# Altium PCB HONGGAN_拼版.PcbDoc (part 1 of 5)
Units mm, origin at the board's own origin, x right, y up, seen from the top; angles counter-clockwise.
Board outline 106.01 x 72.01 mm, 4 copper layers (Top Layer, Mid-Layer 1, Mid-Layer 2, Bottom Layer); 400 components, 0 nets, 1244 pads, 3211 vias.
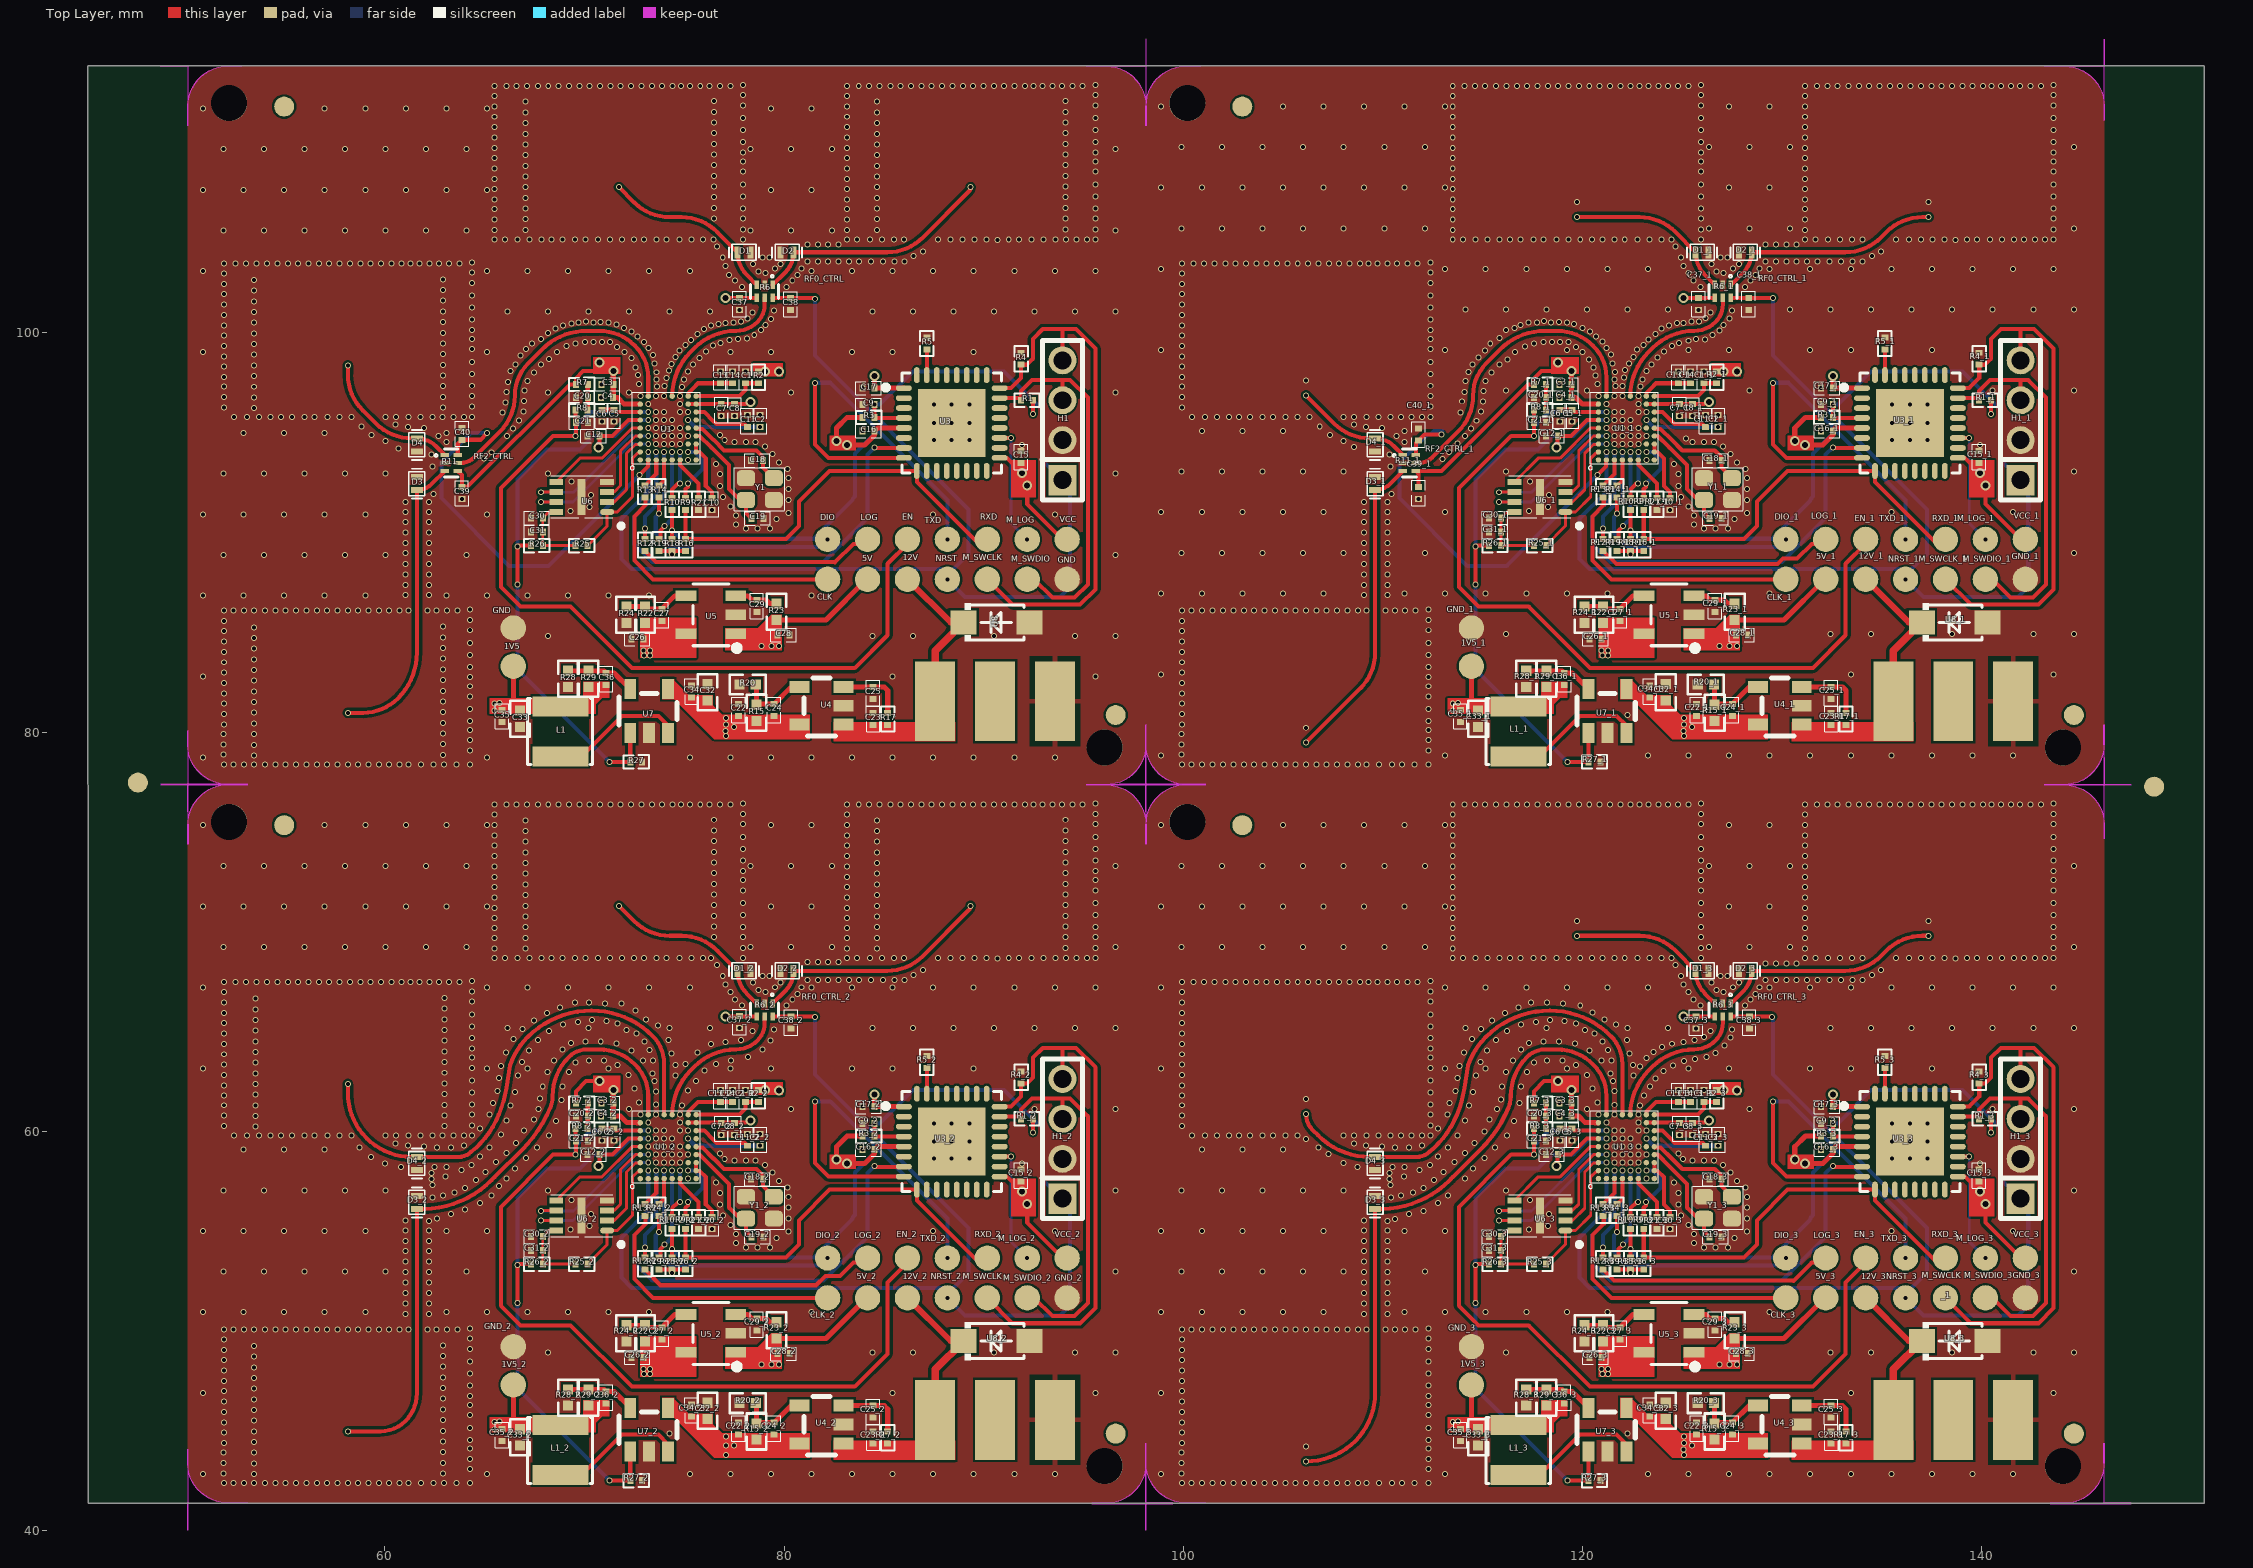
[diagram p0: Top Layer view]
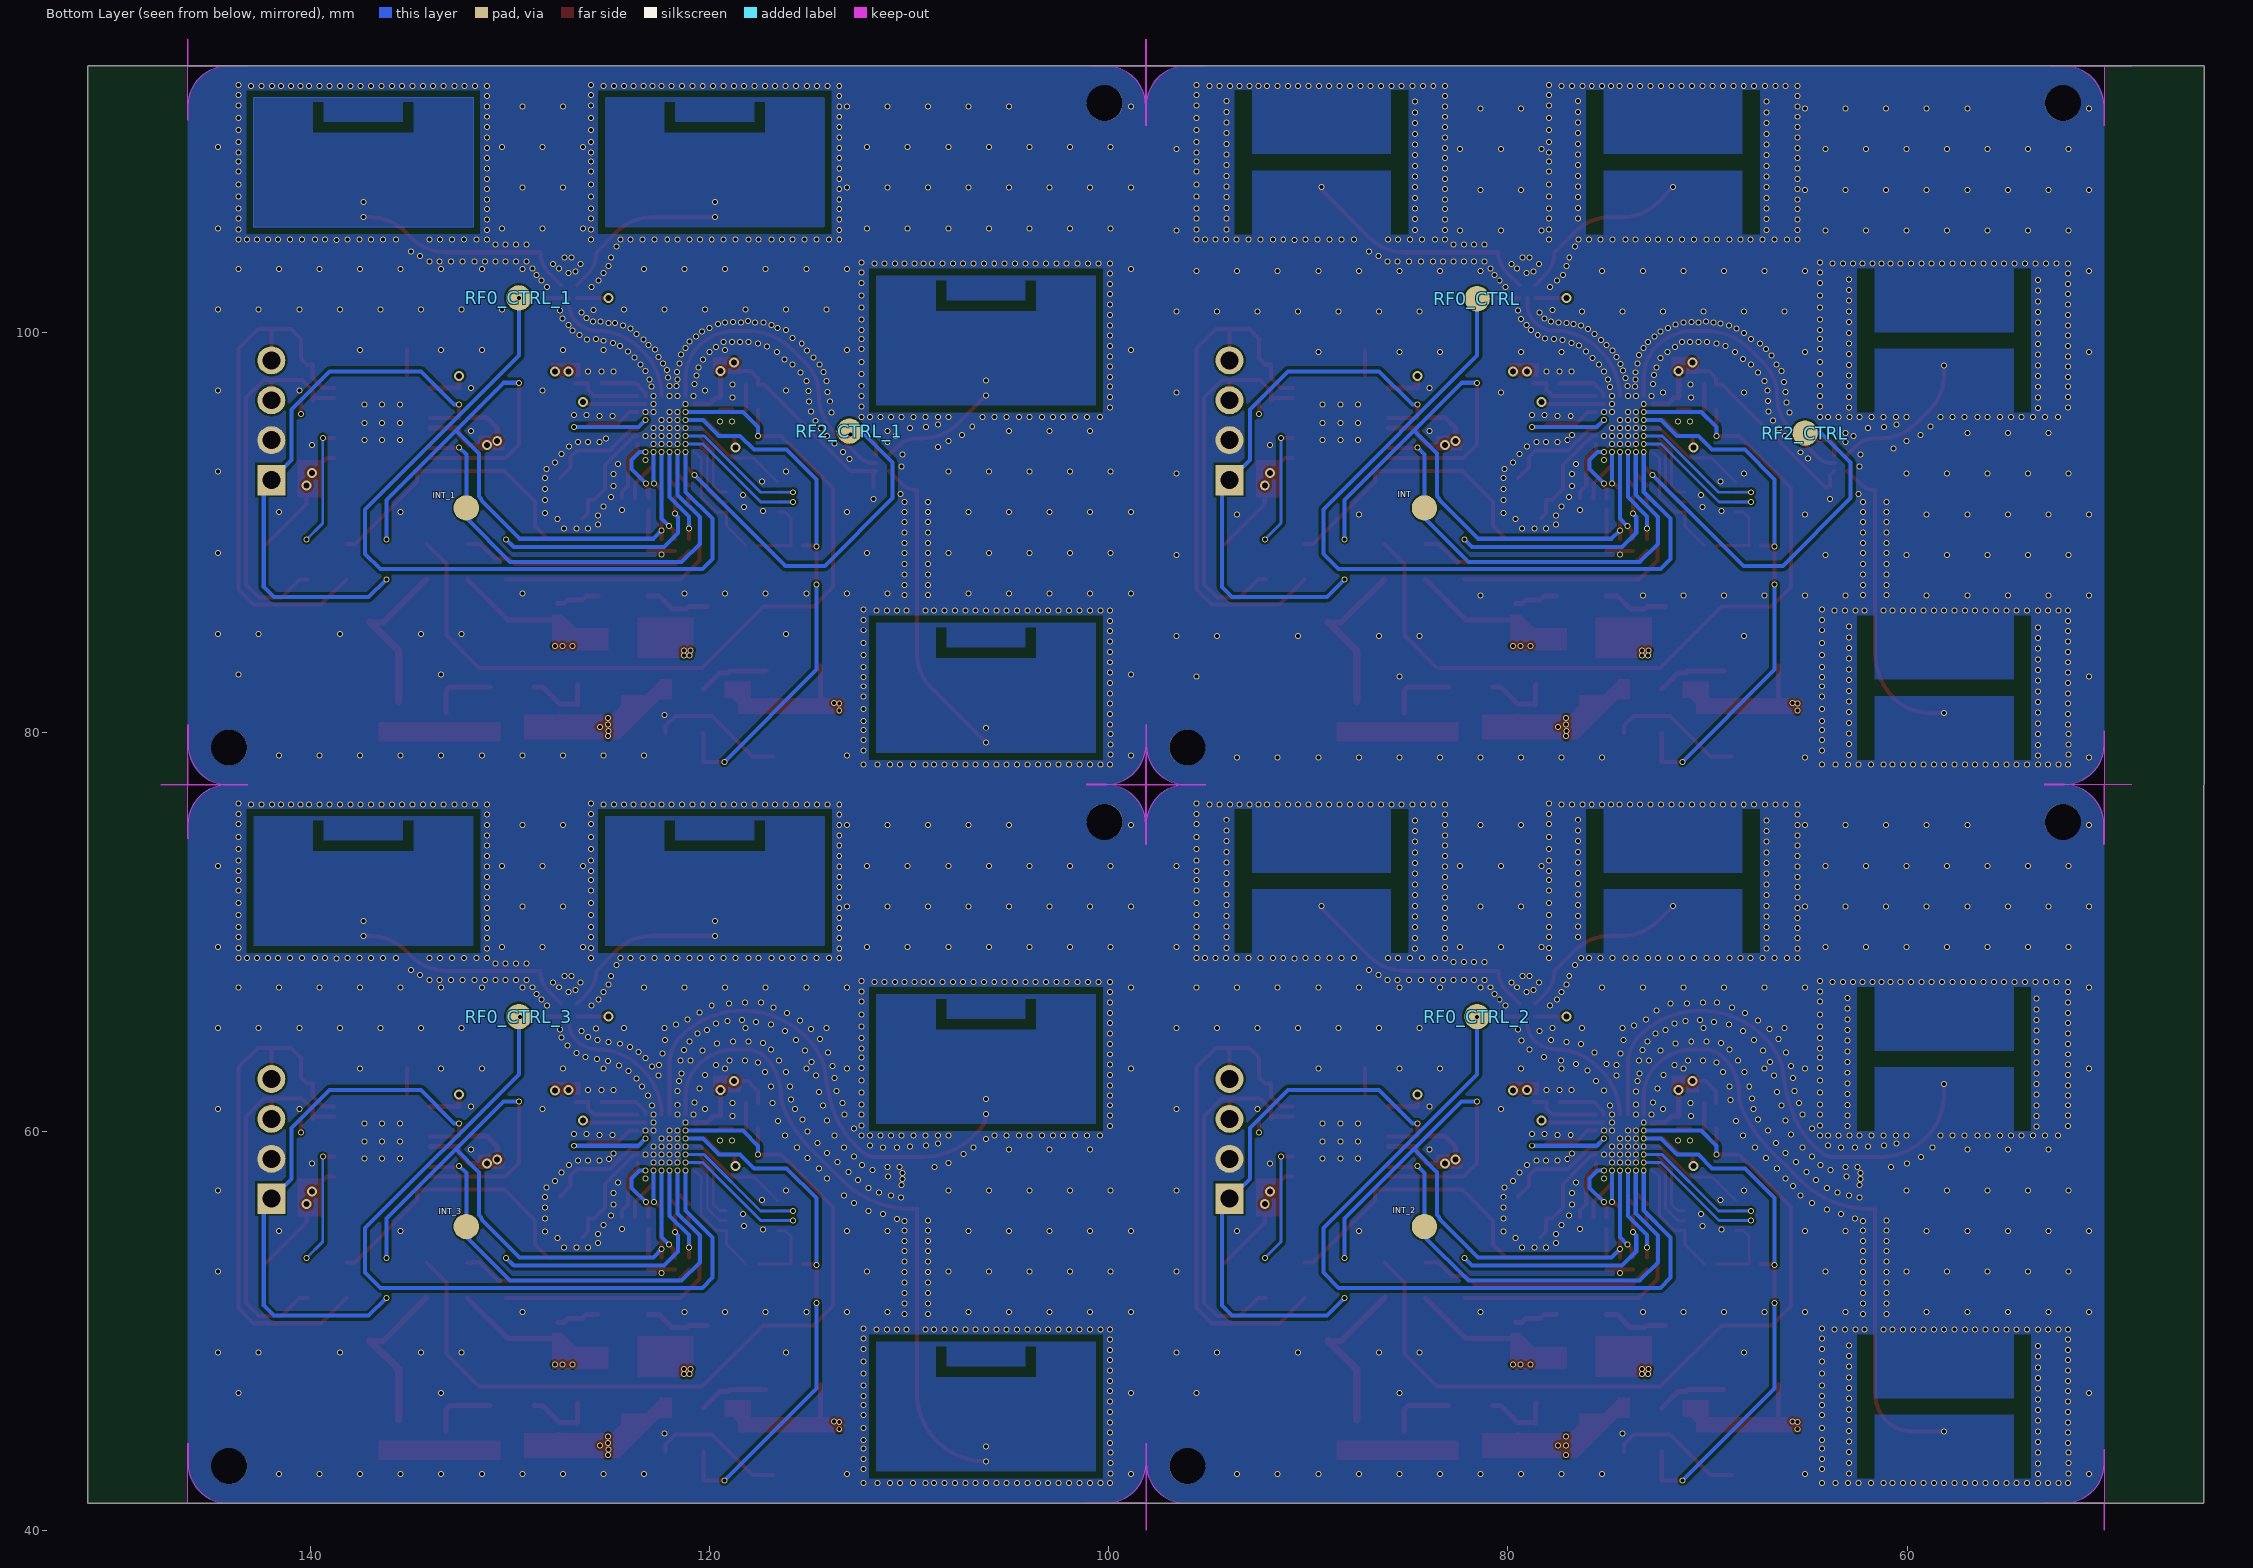
[diagram p1: Bottom Layer view, seen from below]
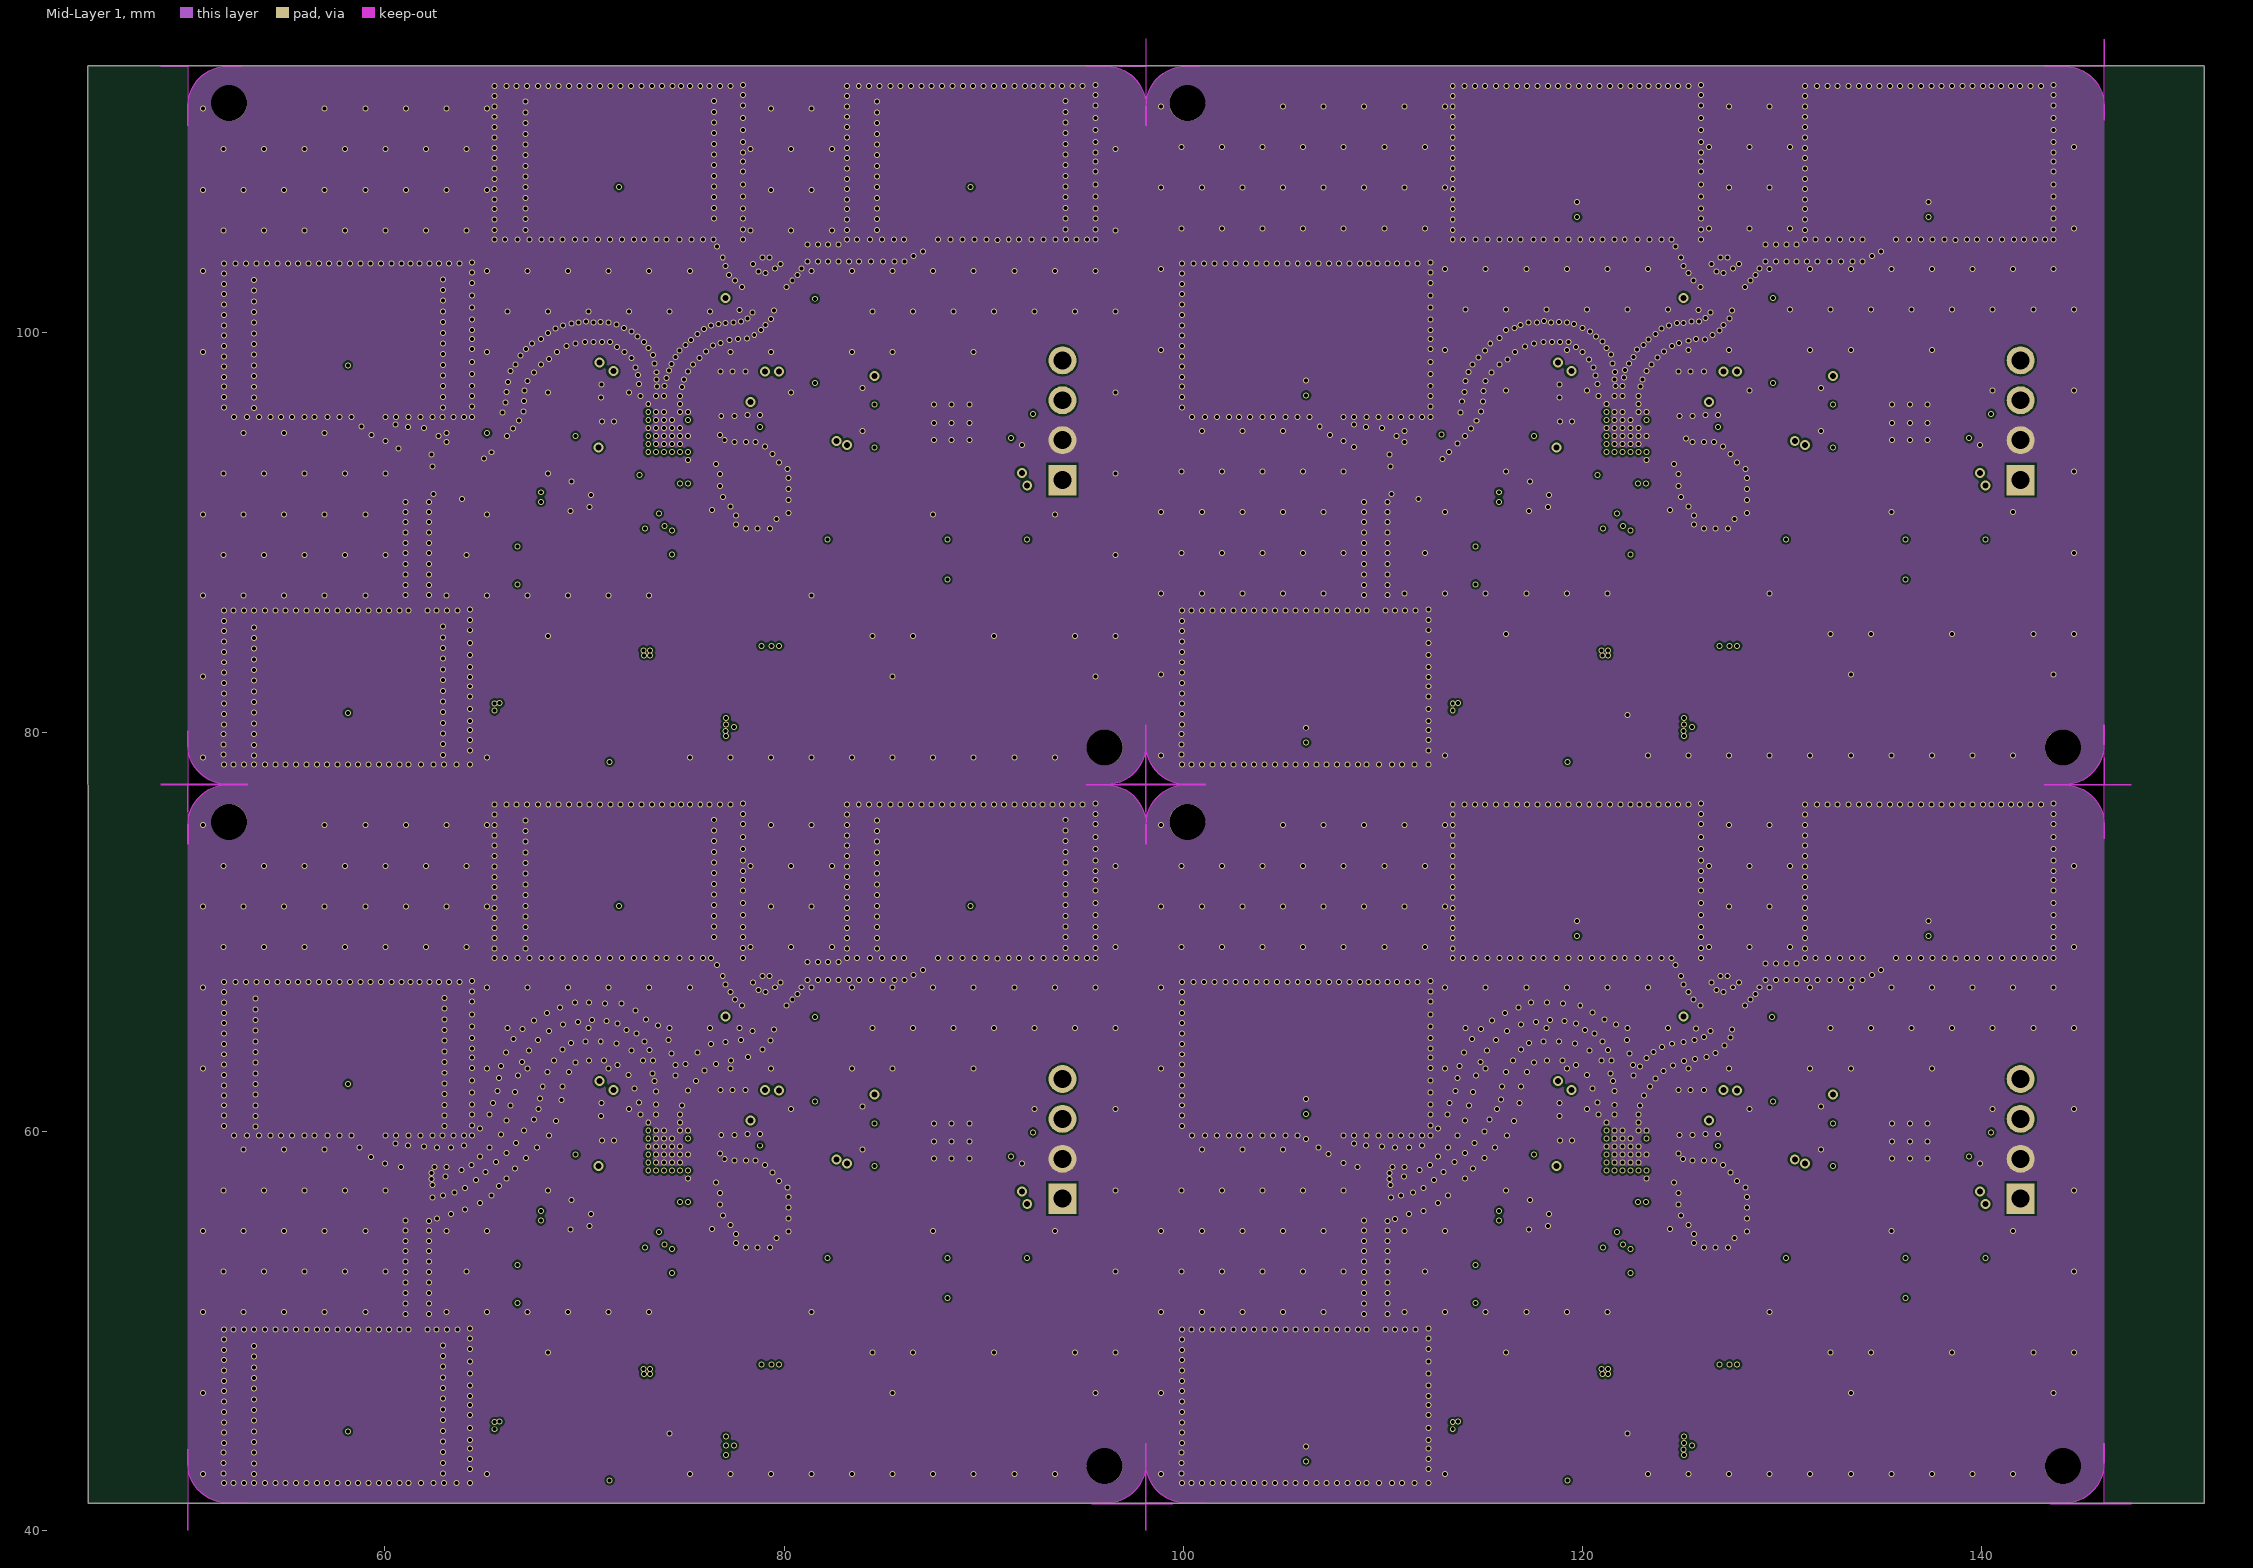
[diagram p2: Mid-Layer 1]
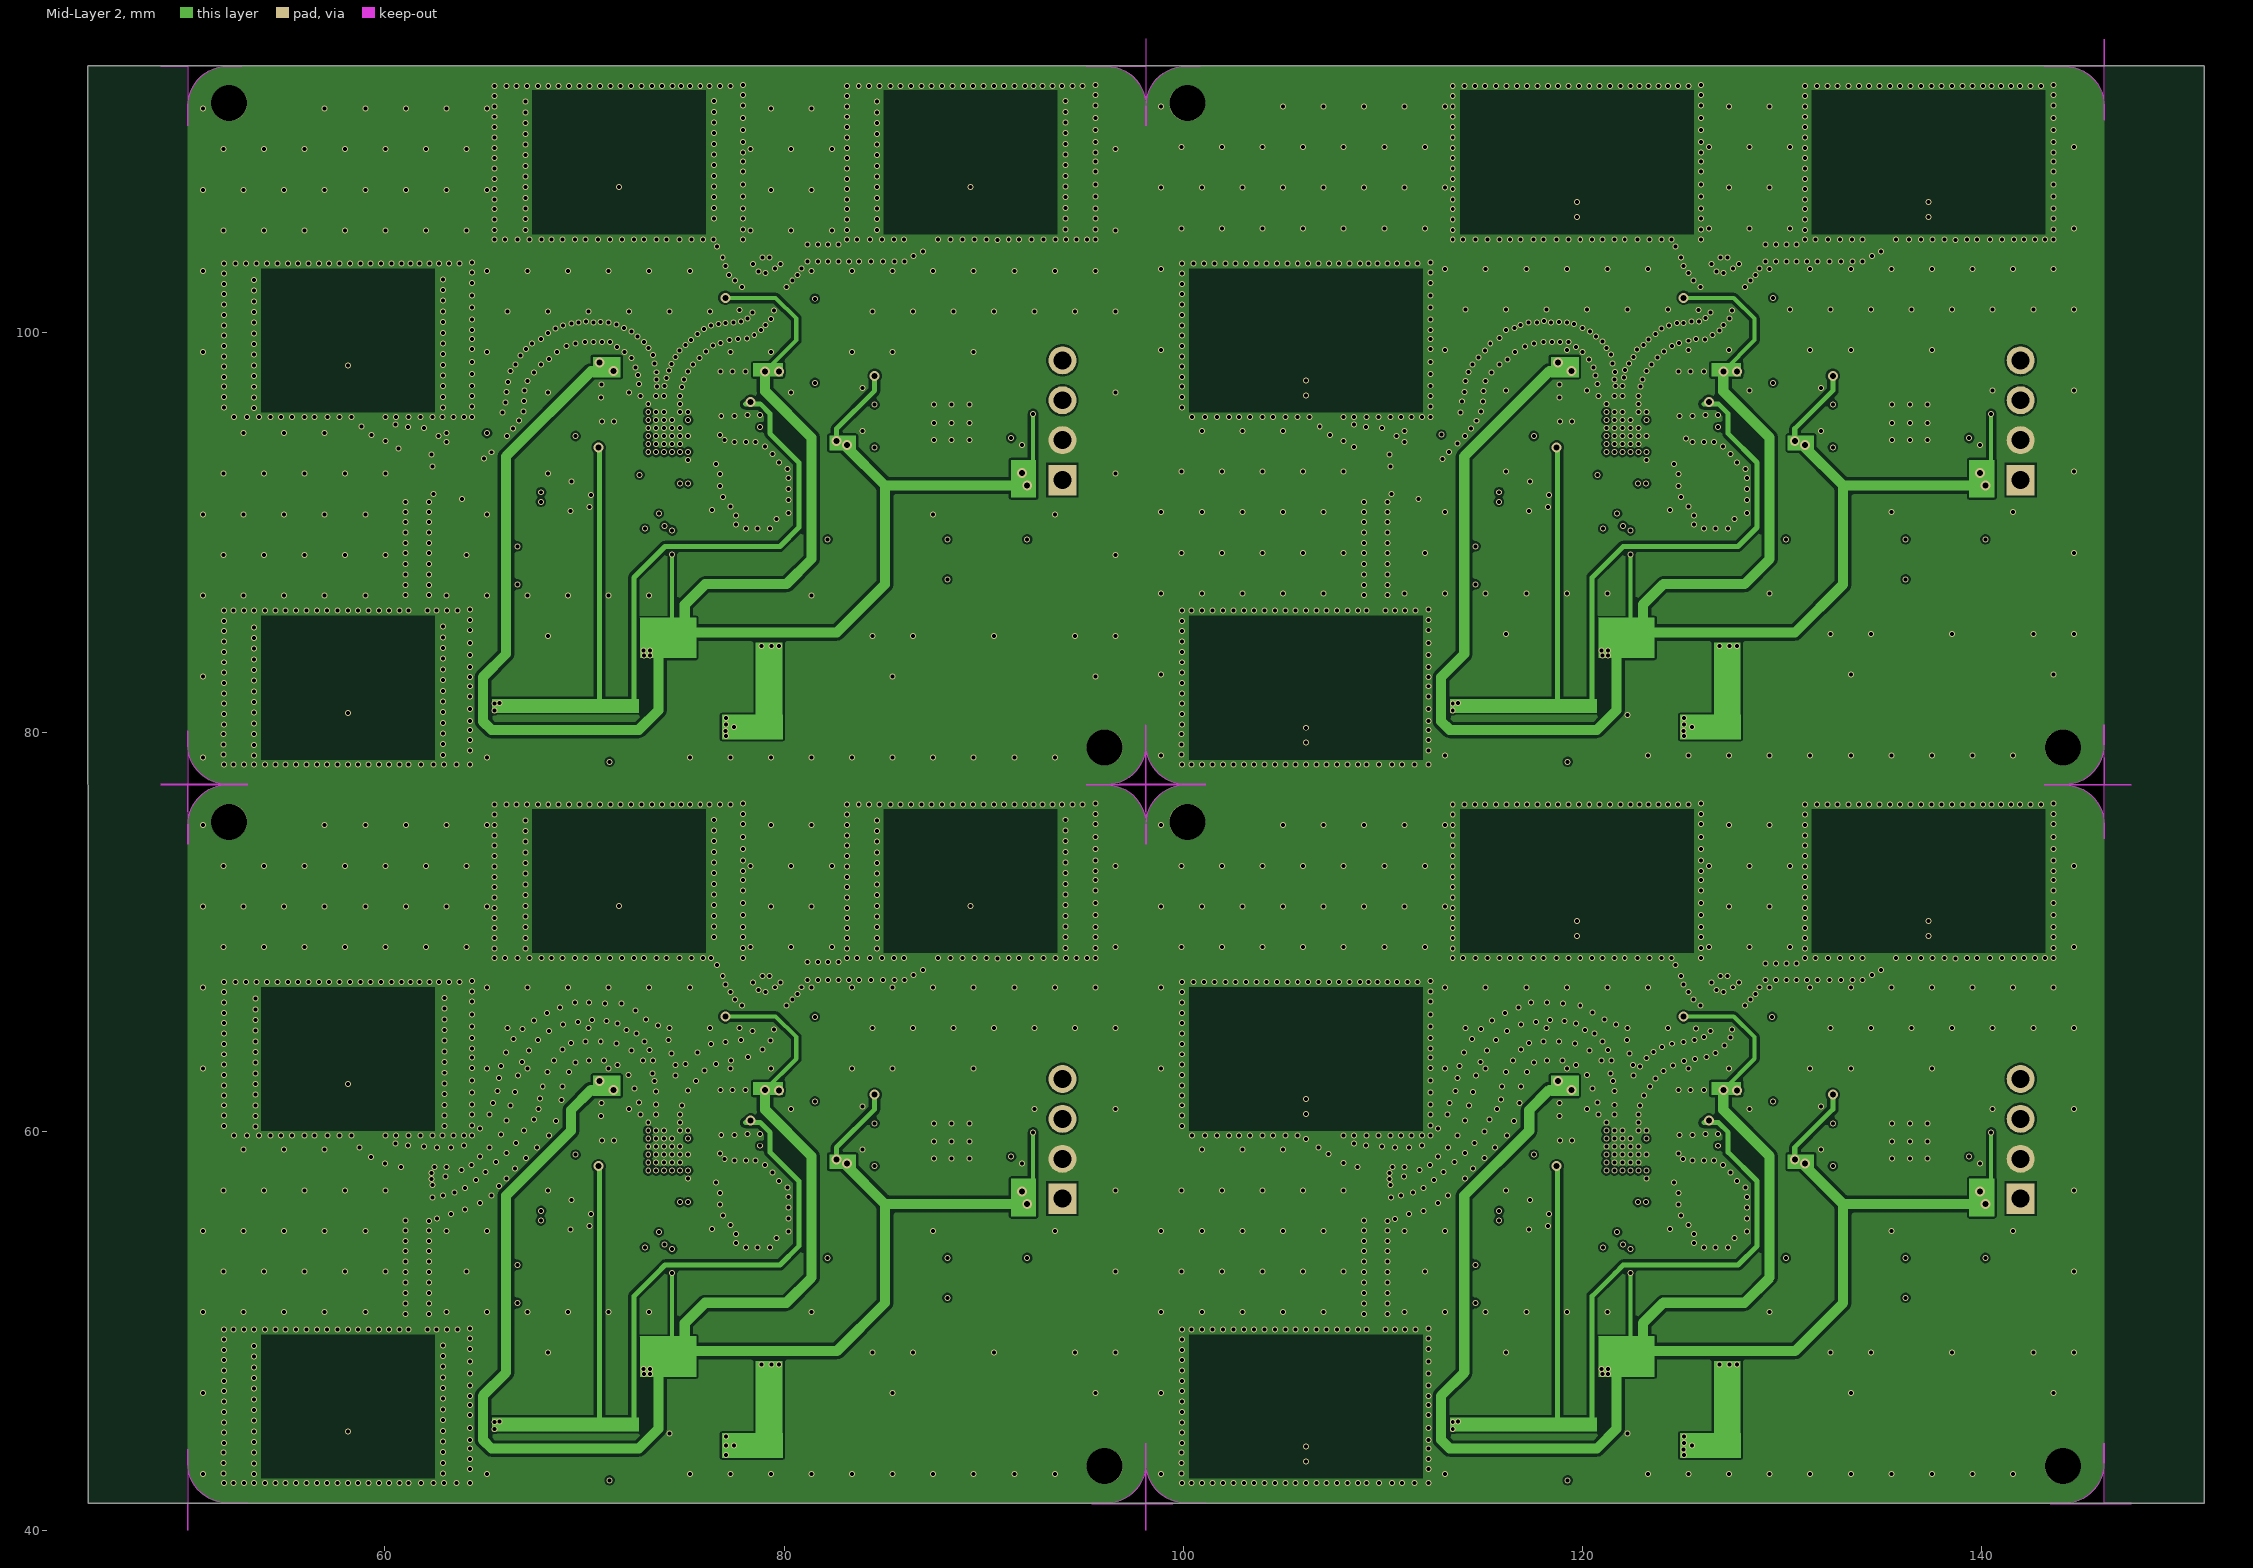
[diagram p3: Mid-Layer 2]

## Layer stack, top to bottom
Top Solder: solder mask 0.0102, Solder Resist, Dk 3.5
Top Layer: signal copper 0.0356
Dielectric 1: dielectric 0.32, FR-4, Dk 4.8
Mid-Layer 1: signal copper 0.0356
Dielectric3: dielectric 0.32, FR-4, Dk 4.8
Mid-Layer 2: signal copper 0.0356
Dielectric2: dielectric 0.32, FR-4, Dk 4.8
Bottom Layer: signal copper 0.0356
Bottom Solder: solder mask 0.0102, Solder Resist, Dk 3.5

## Board outline
45.128,41.361 98.127,41.361 151.126,41.361 151.134,41.368 151.134,113.368 151.126,113.374 45.128,113.374 45.12,113.368
cut-out: 98.127,44.365 98.127,43.362 98.113,43.362 98.113,44.365 98.113,43.361 cw(c96.12,43.361) 96.12,41.368 95.415,41.368 95.415,41.354 99.479,41.354 99.479,41.368 98.127,41.368
cut-out: 146.127,44.365 146.127,43.362 146.113,43.362 146.113,44.365 146.113,43.361 cw(c144.12,43.361) 144.12,41.368 143.415,41.368 143.415,41.354 147.479,41.354 147.479,41.368 146.127,41.368
cut-out: 146.127,80.365 146.127,79.362 146.113,79.362 146.113,80.365 146.113,79.361 cw(c144.12,79.361) 144.12,77.368 143.415,77.368 143.415,77.354 147.479,77.354 147.479,77.368 146.127,77.368
cut-out: 98.127,80.365 98.127,79.362 98.113,79.362 98.113,80.365 98.113,79.361 cw(c96.12,79.361) 96.12,77.368 95.415,77.368 95.415,77.354 99.479,77.354 99.479,77.368 98.127,77.368
cut-out: 101.125,77.368 100.121,77.368 100.122,77.381 101.125,77.381 100.12,77.381 cw(c100.12,79.374) 98.127,79.374 98.127,80.079 98.113,80.079 98.113,76.015 98.127,76.015 98.127,77.368
cut-out: 101.125,41.368 100.121,41.368 100.122,41.381 101.125,41.381 100.12,41.381 cw(c100.12,43.374) 98.127,43.374 98.127,44.079 98.113,44.079 98.113,40.015 98.127,40.015 98.127,41.368
cut-out: 53.125,41.368 52.121,41.368 52.122,41.381 53.125,41.381 52.12,41.381 cw(c52.12,43.374) 50.127,43.374 50.127,44.079 50.113,44.079 50.113,40.015 50.127,40.015 50.127,41.368
cut-out: 53.125,77.368 52.121,77.368 52.122,77.381 53.125,77.381 52.12,77.381 cw(c52.12,79.374) 50.127,79.374 50.127,80.079 50.113,80.079 50.113,76.015 50.127,76.015 50.127,77.368
cut-out: 143.129,77.368 144.132,77.368 144.132,77.354 143.129,77.354 144.134,77.354 cw(c144.134,75.361) 146.127,75.361 146.127,74.656 146.141,74.656 146.141,78.72 146.127,78.72 146.127,77.368
cut-out: 95.129,77.368 96.132,77.368 96.132,77.354 95.129,77.354 96.134,77.354 cw(c96.134,75.361) 98.127,75.361 98.127,74.656 98.141,74.656 98.141,78.72 98.127,78.72 98.127,77.368
cut-out: 95.129,113.368 96.132,113.368 96.132,113.354 95.129,113.354 96.134,113.354 cw(c96.134,111.361) 98.127,111.361 98.127,110.656 98.141,110.656 98.141,114.72 98.127,114.72 98.127,113.368
cut-out: 98.127,110.37 98.127,111.373 98.14,111.373 98.14,110.37 98.141,111.374 cw(c100.134,111.374) 100.134,113.368 100.839,113.368 100.839,113.381 96.775,113.381 96.775,113.368 98.127,113.368
cut-out: 98.127,74.37 98.127,75.373 98.14,75.373 98.14,74.37 98.141,75.374 cw(c100.134,75.374) 100.134,77.368 100.839,77.368 100.839,77.381 96.775,77.381 96.775,77.368 98.127,77.368
cut-out: 50.127,74.37 50.127,75.373 50.14,75.373 50.14,74.37 50.141,75.374 cw(c52.134,75.374) 52.134,77.368 52.839,77.368 52.839,77.381 48.775,77.381 48.775,77.368 50.127,77.368
cut-out: 143.129,113.368 144.132,113.368 144.132,113.354 143.129,113.354 144.134,113.354 cw(c144.134,111.361) 146.127,111.361 146.127,110.656 146.141,110.656 146.141,114.72 146.127,114.72 146.127,113.368
cut-out: 50.12,110.363 50.12,111.366 50.134,111.366 50.134,110.363 50.134,111.368 cw(c52.127,111.368) 52.127,113.361 52.832,113.361 52.832,113.374 48.768,113.374 48.768,113.361 50.12,113.361

## Design rules (kind name [scope] priority, off if disabled: settings)
Clearance [All] p1: gap=0.254 ignorepadtopadclearanceinfootprint=FALSE
PolygonConnect [All] p1: connectstyle=Relief reliefconductorwidth=0.254 reliefentries=4 polygonreliefangle="90 Angle" airgapwidth=0.254
RoutingVias [All] p1: holewidth=0.711 width=1.27 viastyle="Through Hole" minholewidth=0.711 minwidth=1.27 maxholewidth=0.711 maxwidth=1.27
SolderMaskExpansion [All] p1: expansion=0.102 istentingtop=FALSE
Width [All] p1: maxlimit=0.254 minlimit=0.254 preferedwidth=0.254
30 further rules are at their usual default settings.

## Components (designator, comment, footprint, x,y, rotation, side; value= is the part's Value field where it differs from the comment)
1V5 "测试点" 测试点_2#1 66.38,85.357 r90 top
1V5_1 "测试点" 测试点_2#1 114.38,85.357 r90 top (schematic designator 1V5)
1V5_2 "测试点" 测试点_2#1 66.38,49.357 r90 top (schematic designator 1V5)
1V5_3 "测试点" 测试点_2#1 114.38,49.357 r90 top (schematic designator 1V5)
5V "测试点" 测试点_2#1 86.235,87.705 r0 top
5V_1 "测试点" 测试点_2#1 134.235,87.705 r0 top (schematic designator 5V)
5V_2 "测试点" 测试点_2#1 86.235,51.705 r0 top (schematic designator 5V)
5V_3 "测试点" 测试点_2#1 134.235,51.705 r0 top (schematic designator 5V)
12V "测试点" 测试点_2#1 86.127,89.712 r90 top
12V_1 "测试点" 测试点_2#1 134.127,89.712 r90 top (schematic designator 12V)
12V_2 "测试点" 测试点_2#1 86.127,53.712 r90 top (schematic designator 12V)
12V_3 "测试点" 测试点_2#1 134.127,53.712 r90 top (schematic designator 12V)
_1 "M_SWCLK" 测试点_2#1 138.127,53.712 r90 top
C1 "1uF_0201" C0201_2 78.073,97.776 r270 top
C1_1 "1uF_0201" C0201_2 126.073,97.776 r270 top (schematic designator C1)
C1_2 "1uF_0201" C0201_2 78.073,61.776 r270 top (schematic designator C1)
C1_3 "1uF_0201" C0201_2 126.073,61.776 r270 top (schematic designator C1)
C2 "1uF_0201" C0201_2 78.793,95.578 r270 top
C2_1 "1uF_0201" C0201_2 126.793,95.578 r270 top (schematic designator C2)
C2_2 "1uF_0201" C0201_2 78.793,59.578 r270 top (schematic designator C2)
C2_3 "1uF_0201" C0201_2 126.793,59.578 r270 top (schematic designator C2)
C3 "1uF_0201" C0201_2 71.139,97.422 r0 top
C3_1 "1uF_0201" C0201_2 119.139,97.422 r0 top (schematic designator C3)
C3_2 "1uF_0201" C0201_2 71.139,61.422 r0 top (schematic designator C3)
C3_3 "1uF_0201" C0201_2 119.139,61.422 r0 top (schematic designator C3)
C4 "10nF_0201" C0201_2 71.137,96.768 r0 top
C4_1 "10nF_0201" C0201_2 119.137,96.768 r0 top (schematic designator C4)
C4_2 "10nF_0201" C0201_2 71.137,60.768 r0 top (schematic designator C4)
C4_3 "10nF_0201" C0201_2 119.137,60.768 r0 top (schematic designator C4)
C5 "1uF_0201" C0201_2 71.467,95.848 r90 top
C5_1 "1uF_0201" C0201_2 119.467,95.848 r90 top (schematic designator C5)
C5_2 "1uF_0201" C0201_2 71.467,59.848 r90 top (schematic designator C5)
C5_3 "1uF_0201" C0201_2 119.467,59.848 r90 top (schematic designator C5)
C6 "10nF_0201" C0201_2 70.867,95.848 r90 top
C6_1 "10nF_0201" C0201_2 118.867,95.848 r90 top (schematic designator C6)
C6_2 "10nF_0201" C0201_2 70.867,59.848 r90 top (schematic designator C6)
C6_3 "10nF_0201" C0201_2 118.867,59.848 r90 top (schematic designator C6)
C7 "1uF_0201" C0201_2 76.849,96.128 r270 top
C7_1 "1uF_0201" C0201_2 124.849,96.128 r270 top (schematic designator C7)
C7_2 "1uF_0201" C0201_2 76.849,60.128 r270 top (schematic designator C7)
C7_3 "1uF_0201" C0201_2 124.849,60.128 r270 top (schematic designator C7)
C8 "10nF_0201" C0201_2 77.514,96.125 r270 top
C8_1 "10nF_0201" C0201_2 125.514,96.125 r270 top (schematic designator C8)
C8_2 "10nF_0201" C0201_2 77.514,60.125 r270 top (schematic designator C8)
C8_3 "10nF_0201" C0201_2 125.514,60.125 r270 top (schematic designator C8)
C9 "0.1uF_0201" C0201_2 84.232,96.403 r180 top
C9_1 "0.1uF_0201" C0201_2 132.232,96.403 r180 top (schematic designator C9)
C9_2 "0.1uF_0201" C0201_2 84.232,60.403 r180 top (schematic designator C9)
C9_3 "0.1uF_0201" C0201_2 132.232,60.403 r180 top (schematic designator C9)
C10 "1uF_0201" C0201_2 76.382,91.418 r90 top
C10_1 "1uF_0201" C0201_2 124.382,91.418 r90 top (schematic designator C10)
C10_2 "1uF_0201" C0201_2 76.382,55.418 r90 top (schematic designator C10)
C10_3 "1uF_0201" C0201_2 124.382,55.418 r90 top (schematic designator C10)
C11 "1uF_0201" C0201_2 78.158,95.578 r270 top
C11_1 "1uF_0201" C0201_2 126.158,95.578 r270 top (schematic designator C11)
C11_2 "1uF_0201" C0201_2 78.158,59.578 r270 top (schematic designator C11)
C11_3 "1uF_0201" C0201_2 126.158,59.578 r270 top (schematic designator C11)
C12 "1uF_0201" C0201_2 70.457,94.833 r0 top
C12_1 "1uF_0201" C0201_2 118.457,94.833 r0 top (schematic designator C12)
C12_2 "1uF_0201" C0201_2 70.457,58.833 r0 top (schematic designator C12)
C12_3 "1uF_0201" C0201_2 118.457,58.833 r0 top (schematic designator C12)
C13 "10nF_0201" C0201_2 76.803,97.776 r270 top
C13_1 "10nF_0201" C0201_2 124.803,97.776 r270 top (schematic designator C13)
C13_2 "10nF_0201" C0201_2 76.803,61.776 r270 top (schematic designator C13)
C13_3 "10nF_0201" C0201_2 124.803,61.776 r270 top (schematic designator C13)
C14 "1uF_0201" C0201_2 77.407,97.776 r270 top
C14_1 "1uF_0201" C0201_2 125.407,97.776 r270 top (schematic designator C14)
C14_2 "1uF_0201" C0201_2 77.407,61.776 r270 top (schematic designator C14)
C14_3 "1uF_0201" C0201_2 125.407,61.776 r270 top (schematic designator C14)
C15 "0.1uF_0201" C0201_2 91.868,93.784 r90 top
C15_1 "0.1uF_0201" C0201_2 139.868,93.784 r90 top (schematic designator C15)
C15_2 "0.1uF_0201" C0201_2 91.868,57.784 r90 top (schematic designator C15)
C15_3 "0.1uF_0201" C0201_2 139.868,57.784 r90 top (schematic designator C15)
C16 "0.1uF_0201" C0201_2 84.232,95.094 r180 top
C16_1 "0.1uF_0201" C0201_2 132.232,95.094 r180 top (schematic designator C16)
C16_2 "0.1uF_0201" C0201_2 84.232,59.094 r180 top (schematic designator C16)
C16_3 "0.1uF_0201" C0201_2 132.232,59.094 r180 top (schematic designator C16)
C17 "0.1uF_0201" C0201_2 84.232,97.234 r180 top
C17_1 "0.1uF_0201" C0201_2 132.232,97.234 r180 top (schematic designator C17)
C17_2 "0.1uF_0201" C0201_2 84.232,61.234 r180 top (schematic designator C17)
C17_3 "0.1uF_0201" C0201_2 132.232,61.234 r180 top (schematic designator C17)
C18 "12pF_0201" C0201_2 78.65,93.605 r180 top
C18_1 "12pF_0201" C0201_2 126.65,93.605 r180 top (schematic designator C18)
C18_2 "12pF_0201" C0201_2 78.65,57.605 r180 top (schematic designator C18)
C18_3 "12pF_0201" C0201_2 126.65,57.605 r180 top (schematic designator C18)
C19 "12pF_0201" C0201_2 78.666,90.706 r0 top
C19_1 "12pF_0201" C0201_2 126.666,90.706 r0 top (schematic designator C19)
C19_2 "12pF_0201" C0201_2 78.666,54.706 r0 top (schematic designator C19)
C19_3 "12pF_0201" C0201_2 126.666,54.706 r0 top (schematic designator C19)
C20 "100nF_0201" C0201_2 69.862,96.761 r0 top
C20_1 "100nF_0201" C0201_2 117.862,96.761 r0 top (schematic designator C20)
C20_2 "100nF_0201" C0201_2 69.862,60.761 r0 top (schematic designator C20)
C20_3 "100nF_0201" C0201_2 117.862,60.761 r0 top (schematic designator C20)
C21 "1uF_0201" C0201_2 69.862,95.508 r0 top
C21_1 "1uF_0201" C0201_2 117.862,95.508 r0 top (schematic designator C21)
C21_2 "1uF_0201" C0201_2 69.862,59.508 r0 top (schematic designator C21)
C21_3 "1uF_0201" C0201_2 117.862,59.508 r0 top (schematic designator C21)
C22 "2.2uF_0201" C0201_2 77.711,81.111 r270 top
C22_1 "2.2uF_0201" C0201_2 125.711,81.111 r270 top (schematic designator C22)
C22_2 "2.2uF_0201" C0201_2 77.711,45.111 r270 top (schematic designator C22)
C22_3 "2.2uF_0201" C0201_2 125.711,45.111 r270 top (schematic designator C22)
C23 "2.2uF_0201" C0201_2 84.454,80.654 r270 top
C23_1 "2.2uF_0201" C0201_2 132.454,80.654 r270 top (schematic designator C23)
C23_2 "2.2uF_0201" C0201_2 84.454,44.654 r270 top (schematic designator C23)
C23_3 "2.2uF_0201" C0201_2 132.454,44.654 r270 top (schematic designator C23)
C24 "100pF_0201" C0201_2 79.501,81.111 r90 top
C24_1 "100pF_0201" C0201_2 127.501,81.111 r90 top (schematic designator C24)
C24_2 "100pF_0201" C0201_2 79.501,45.111 r90 top (schematic designator C24)
C24_3 "100pF_0201" C0201_2 127.501,45.111 r90 top (schematic designator C24)
C25 "0.1uF_0201" C0201_2 84.454,81.955 r90 top
C25_1 "0.1uF_0201" C0201_2 132.454,81.955 r90 top (schematic designator C25)
C25_2 "0.1uF_0201" C0201_2 84.454,45.955 r90 top (schematic designator C25)
C25_3 "0.1uF_0201" C0201_2 132.454,45.955 r90 top (schematic designator C25)
C26 "2.2uF_0201" C0201_2 72.646,84.661 r0 top
C26_1 "2.2uF_0201" C0201_2 120.646,84.661 r0 top (schematic designator C26)
C26_2 "2.2uF_0201" C0201_2 72.646,48.661 r0 top (schematic designator C26)
C26_3 "2.2uF_0201" C0201_2 120.646,48.661 r0 top (schematic designator C26)
C27 "22pF_0201" C0201_2 73.876,85.877 r90 top
C27_1 "22pF_0201" C0201_2 121.876,85.877 r90 top (schematic designator C27)
C27_2 "22pF_0201" C0201_2 73.876,49.877 r90 top (schematic designator C27)
C27_3 "22pF_0201" C0201_2 121.876,49.877 r90 top (schematic designator C27)
C28 "1uF_0201" C0201_2 79.972,84.861 r180 top
C28_1 "1uF_0201" C0201_2 127.972,84.861 r180 top (schematic designator C28)
C28_2 "1uF_0201" C0201_2 79.972,48.861 r180 top (schematic designator C28)
C28_3 "1uF_0201" C0201_2 127.972,48.861 r180 top (schematic designator C28)
C29 "0.1uF_0201" C0201_2 78.631,86.327 r90 top
C29_1 "0.1uF_0201" C0201_2 126.631,86.327 r90 top (schematic designator C29)
C29_2 "0.1uF_0201" C0201_2 78.631,50.327 r90 top (schematic designator C29)
C29_3 "0.1uF_0201" C0201_2 126.631,50.327 r90 top (schematic designator C29)
C30 "1uF 0201" C0201_2 67.608,90.729 r0 top
C30_1 "1uF 0201" C0201_2 115.608,90.729 r0 top (schematic designator C30)
C30_2 "1uF 0201" C0201_2 67.608,54.729 r0 top (schematic designator C30)
C30_3 "1uF 0201" C0201_2 115.608,54.729 r0 top (schematic designator C30)
C31 "10nF 0201" C0201_2 67.608,90.02 r0 top
C31_1 "10nF 0201" C0201_2 115.608,90.02 r0 top (schematic designator C31)
C31_2 "10nF 0201" C0201_2 67.608,54.02 r0 top (schematic designator C31)
C31_3 "10nF 0201" C0201_2 115.608,54.02 r0 top (schematic designator C31)
C32 "10uF 0402" C0402 76.162,81.998 r90 top
C32_1 "10uF 0402" C0402 124.162,81.998 r90 top (schematic designator C32)
C32_2 "10uF 0402" C0402 76.162,45.998 r90 top (schematic designator C32)
C32_3 "10uF 0402" C0402 124.162,45.998 r90 top (schematic designator C32)
C33 "10uF 0402" C0402 66.764,80.67 r270 top
C33_1 "10uF 0402" C0402 114.764,80.67 r270 top (schematic designator C33)
C33_2 "10uF 0402" C0402 66.764,44.67 r270 top (schematic designator C33)
C33_3 "10uF 0402" C0402 114.764,44.67 r270 top (schematic designator C33)
C34 "10nF_0201" C0201_2 75.363,82.026 r270 top
C34_1 "10nF_0201" C0201_2 123.363,82.026 r270 top (schematic designator C34)
C34_2 "10nF_0201" C0201_2 75.363,46.026 r270 top (schematic designator C34)
C34_3 "10nF_0201" C0201_2 123.363,46.026 r270 top (schematic designator C34)
C35 "10nF_0201" C0201_2 65.875,80.797 r90 top
C35_1 "10nF_0201" C0201_2 113.875,80.797 r90 top (schematic designator C35)
C35_2 "10nF_0201" C0201_2 65.875,44.797 r90 top (schematic designator C35)
C35_3 "10nF_0201" C0201_2 113.875,44.797 r90 top (schematic designator C35)
C36 "47pF_0201" C0201_2 71.079,82.664 r270 top
C36_1 "47pF_0201" C0201_2 119.079,82.664 r270 top (schematic designator C36)
C36_2 "47pF_0201" C0201_2 71.079,46.664 r270 top (schematic designator C36)
C36_3 "47pF_0201" C0201_2 119.079,46.664 r270 top (schematic designator C36)
C37 "100pF_0201" C0201_2 77.768,101.452 r90 top
C37_1 "100pF_0201" C0201_2 125.813,101.452 r90 top (schematic designator C37)
C37_2 "100pF_0201" C0201_2 77.768,65.476 r90 top (schematic designator C37)
C37_3 "100pF_0201" C0201_2 125.686,65.452 r90 top (schematic designator C37)
C38 "100pF_0201" C0201_2 80.322,101.436 r90 top
C38_1 "100pF_0201" C0201_2 128.322,101.452 r90 top (schematic designator C38)
C38_2 "100pF_0201" C0201_2 80.353,65.452 r90 top (schematic designator C38)
C38_3 "100pF_0201" C0201_2 128.353,65.452 r90 top (schematic designator C38)
C39 "100pF_0201" C0201_2 63.858,91.968 r90 top
C39_1 "100pF_0201" C0201_2 111.778,91.979 r90 top (schematic designator C39)
C40 "100pF_0201" C0201_2 63.858,94.945 r270 top
C40_1 "100pF_0201" C0201_2 111.778,94.903 r270 top (schematic designator C40)
CLK "测试点" 测试点_2#1 82.127,89.712 r90 top
CLK_1 "测试点" 测试点_2#1 130.127,89.712 r90 top (schematic designator CLK)
CLK_2 "测试点" 测试点_2#1 82.127,53.712 r90 top (schematic designator CLK)
CLK_3 "测试点" 测试点_2#1 130.127,53.712 r90 top (schematic designator CLK)
D1 "h5vl10b" SOD-882_L1.0-W0.6-BI 77.988,104.038 r180 top
D1_1 "h5vl10b" SOD-882_L1.0-W0.6-BI 125.988,104.038 r180 top (schematic designator D1)
D1_2 "h5vl10b" SOD-882_L1.0-W0.6-BI 77.988,68.038 r180 top (schematic designator D1)
D1_3 "h5vl10b" SOD-882_L1.0-W0.6-BI 125.988,68.038 r180 top (schematic designator D1)
D2 "h5vl10b" SOD-882_L1.0-W0.6-BI 80.147,104.038 r180 top
D2_1 "h5vl10b" SOD-882_L1.0-W0.6-BI 128.147,104.038 r180 top (schematic designator D2)
D2_2 "h5vl10b" SOD-882_L1.0-W0.6-BI 80.147,68.038 r180 top (schematic designator D2)
D2_3 "h5vl10b" SOD-882_L1.0-W0.6-BI 128.147,68.038 r180 top (schematic designator D2)
D3 "h5vl10b" SOD-882_L1.0-W0.6-BI 61.602,92.443 r270 top
D3_1 "h5vl10b" SOD-882_L1.0-W0.6-BI 109.602,92.443 r270 top (schematic designator D3)
D3_2 "h5vl10b" SOD-882_L1.0-W0.6-BI 61.602,56.443 r270 top (schematic designator D3)
D3_3 "h5vl10b" SOD-882_L1.0-W0.6-BI 109.602,56.443 r270 top (schematic designator D3)
D4 "h5vl10b" SOD-882_L1.0-W0.6-BI 61.602,94.391 r270 top
D4_1 "h5vl10b" SOD-882_L1.0-W0.6-BI 109.602,94.391 r270 top (schematic designator D4)
D4_2 "h5vl10b" SOD-882_L1.0-W0.6-BI 61.602,58.391 r90 top (schematic designator D4)
D4_3 "h5vl10b" SOD-882_L1.0-W0.6-BI 109.602,58.391 r90 top (schematic designator D4)
DIO "测试点" 测试点_2#1 82.127,91.712 r90 top (schematic designator DIO1)
DIO_1 "测试点" 测试点_2#1 130.127,91.712 r90 top (schematic designator DIO1)
DIO_2 "测试点" 测试点_2#1 82.127,55.712 r90 top (schematic designator DIO1)
DIO_3 "测试点" 测试点_2#1 130.127,55.712 r90 top (schematic designator DIO1)
EN "测试点" 测试点_2#1 86.127,91.712 r90 top (schematic designator EN1)
EN_1 "测试点" 测试点_2#1 134.127,91.712 r90 top (schematic designator EN1)
EN_2 "测试点" 测试点_2#1 86.127,55.712 r90 top (schematic designator EN1)
EN_3 "测试点" 测试点_2#1 134.127,55.712 r90 top (schematic designator EN1)
GND "测试点" 测试点_2#1 94.127,89.712 r90 top (schematic designator GND1)
GND "测试点" 测试点_2#1 66.38,87.274 r90 top
GND_1 "测试点" 测试点_2#1 142.127,89.712 r90 top (schematic designator GND1)
GND_1 "测试点" 测试点_2#1 114.38,87.274 r90 top (schematic designator GND)
GND_2 "测试点" 测试点_2#1 94.127,53.712 r90 top (schematic designator GND1)
GND_2 "测试点" 测试点_2#1 66.38,51.274 r90 top (schematic designator GND)
GND_3 "测试点" 测试点_2#1 142.127,53.712 r90 top (schematic designator GND1)
GND_3 "测试点" 测试点_2#1 114.38,51.274 r90 top (schematic designator GND)
H1 "ph2.0-01-04pzd" HDR-TH_4P-P2.00-V-M 93.942,95.624 r90 top
H1_1 "ph2.0-01-04pzd" HDR-TH_4P-P2.00-V-M 141.942,95.624 r90 top (schematic designator H1)
H1_2 "ph2.0-01-04pzd" HDR-TH_4P-P2.00-V-M 93.942,59.624 r90 top (schematic designator H1)
H1_3 "ph2.0-01-04pzd" HDR-TH_4P-P2.00-V-M 141.942,59.624 r90 top (schematic designator H1)
INT "测试点" 测试点_2#1 84.229,93.286 r90 bottom (schematic designator INT1)
INT_1 "测试点" 测试点_2#1 132.229,93.286 r90 bottom (schematic designator INT1)
INT_2 "测试点" 测试点_2#1 84.229,57.286 r90 bottom (schematic designator INT1)
INT_3 "测试点" 测试点_2#1 132.229,57.286 r90 bottom (schematic designator INT1)
L1 "2.2uH-3X3MM" 贴片电感(3*3MM)(3010) 68.796,80.035 r270 top value=2.2uH/3*3
L1_1 "2.2uH-3X3MM" 贴片电感(3*3MM)(3010) 116.796,80.035 r270 top value=2.2uH/3*3 (schematic designator L1)
L1_2 "2.2uH-3X3MM" 贴片电感(3*3MM)(3010) 68.796,44.035 r270 top value=2.2uH/3*3 (schematic designator L1)
L1_3 "2.2uH-3X3MM" 贴片电感(3*3MM)(3010) 116.796,44.035 r270 top value=2.2uH/3*3 (schematic designator L1)
LOG "测试点" 测试点_2#1 84.127,91.712 r90 top (schematic designator LOG1)
LOG_1 "测试点" 测试点_2#1 132.127,91.712 r90 top (schematic designator LOG1)
LOG_2 "测试点" 测试点_2#1 84.127,55.712 r90 top (schematic designator LOG1)
LOG_3 "测试点" 测试点_2#1 132.127,55.712 r90 top (schematic designator LOG1)
M_LOG "测试点" 测试点_2#1 92.127,91.712 r90 top
M_LOG_1 "测试点" 测试点_2#1 140.127,91.712 r90 top (schematic designator M_LOG)
M_LOG_2 "测试点" 测试点_2#1 92.127,55.712 r90 top (schematic designator M_LOG)
M_LOG_3 "测试点" 测试点_2#1 140.127,55.712 r90 top (schematic designator M_LOG)
M_SWCLK "" 测试点_2#1 90.127,89.712 r90 top
M_SWCLK_1 "" 测试点_2#1 138.127,89.712 r90 top (schematic designator M_SWCLK)
M_SWDIO "测试点" 测试点_2#1 94.235,87.705 r0 top
M_SWDIO_1 "测试点" 测试点_2#1 142.235,87.705 r0 top (schematic designator M_SWDIO)
M_SWDIO_2 "测试点" 测试点_2#1 94.235,51.705 r0 top (schematic designator M_SWDIO)
M_SWDIO_3 "测试点" 测试点_2#1 142.235,51.705 r0 top (schematic designator M_SWDIO)
NRST "测试点" 测试点_2#1 88.127,89.712 r90 top
NRST_1 "测试点" 测试点_2#1 136.127,89.712 r90 top (schematic designator NRST)
NRST_2 "测试点" 测试点_2#1 88.127,53.712 r90 top (schematic designator NRST)
NRST_3 "测试点" 测试点_2#1 136.127,53.712 r90 top (schematic designator NRST)
R1 "10K 0201" R0201 92.168,96.624 r0 top
R1_1 "10K 0201" R0201 140.168,96.624 r0 top (schematic designator R1)
R1_2 "10K 0201" R0201 92.168,60.624 r0 top (schematic designator R1)
R1_3 "10K 0201" R0201 140.168,60.624 r0 top (schematic designator R1)
R2 "20R 0201" R0201 78.708,97.776 r270 top
R2_1 "20R 0201" R0201 126.708,97.776 r270 top (schematic designator R2)
R2_2 "20R 0201" R0201 78.708,61.776 r270 top (schematic designator R2)
R2_3 "20R 0201" R0201 126.708,61.776 r270 top (schematic designator R2)
R3 "10K 0201" R0201 84.232,95.769 r180 top
R3_1 "10K 0201" R0201 132.232,95.769 r180 top (schematic designator R3)
R3_2 "10K 0201" R0201 84.232,59.769 r180 top (schematic designator R3)
R3_3 "10K 0201" R0201 132.232,59.769 r180 top (schematic designator R3)
R4 "10K 0201" R0201 91.868,98.704 r270 top
R4_1 "10K 0201" R0201 139.868,98.704 r270 top (schematic designator R4)
R4_2 "10K 0201" R0201 91.868,62.704 r270 top (schematic designator R4)
R4_3 "10K 0201" R0201 139.868,62.704 r270 top (schematic designator R4)
R5 "10K 0201" R0201 87.145,99.466 r90 top
R5_1 "10K 0201" R0201 135.145,99.466 r90 top (schematic designator R5)
R5_2 "10K 0201" R0201 87.145,63.466 r90 top (schematic designator R5)
R5_3 "10K 0201" R0201 135.145,63.466 r90 top (schematic designator R5)
R6 "fm8625h" DFN-6_L1.1-W0.7-P0.40-BL 79.026,102.077 r180 top
R6_1 "fm8625h" DFN-6_L1.1-W0.7-P0.40-BL 127.026,102.077 r180 top (schematic designator R6)
R6_2 "fm8625h" DFN-6_L1.1-W0.7-P0.40-BL 79.026,66.077 r180 top (schematic designator R6)
R6_3 "fm8625h" DFN-6_L1.1-W0.7-P0.40-BL 127.026,66.077 r180 top (schematic designator R6)
R7 "100K 0201" R0201 69.862,97.422 r180 top
R7_1 "100K 0201" R0201 117.862,97.422 r180 top (schematic designator R7)
R7_2 "100K 0201" R0201 69.862,61.422 r180 top (schematic designator R7)
R7_3 "100K 0201" R0201 117.862,61.422 r180 top (schematic designator R7)
R8 "10K 0201" R0201 69.859,96.148 r180 top
R8_1 "10K 0201" R0201 117.859,96.148 r180 top (schematic designator R8)
R8_2 "10K 0201" R0201 69.859,60.148 r180 top (schematic designator R8)
R8_3 "10K 0201" R0201 117.859,60.148 r180 top (schematic designator R8)
R9 "47R 0201" R0201 75.062,91.418 r90 top
R9_1 "47R 0201" R0201 123.062,91.418 r90 top (schematic designator R9)
R9_2 "47R 0201" R0201 75.062,55.418 r90 top (schematic designator R9)
R9_3 "47R 0201" R0201 123.062,55.418 r90 top (schematic designator R9)
R10 "47R 0201" R0201 74.392,91.418 r90 top
R10_1 "47R 0201" R0201 122.392,91.418 r90 top (schematic designator R10)
R10_2 "47R 0201" R0201 74.392,55.418 r90 top (schematic designator R10)
R10_3 "47R 0201" R0201 122.392,55.418 r90 top (schematic designator R10)
R11 "fm8625h" DFN-6_L1.1-W0.7-P0.40-BL 63.323,93.48 r270 top
R11_1 "fm8625h" DFN-6_L1.1-W0.7-P0.40-BL 111.323,93.48 r270 top (schematic designator R11)
R12 "47R 0201" R0201 73.022,89.375 r90 top
R12_1 "47R 0201" R0201 121.022,89.375 r90 top (schematic designator R12)
R12_2 "47R 0201" R0201 73.022,53.375 r90 top (schematic designator R12)
R12_3 "47R 0201" R0201 121.022,53.375 r90 top (schematic designator R12)
R13 "47R 0201" R0201 73.022,92.051 r90 top
R13_1 "47R 0201" R0201 121.022,92.051 r90 top (schematic designator R13)
R13_2 "47R 0201" R0201 73.022,56.051 r90 top (schematic designator R13)
R13_3 "47R 0201" R0201 121.022,56.051 r90 top (schematic designator R13)
R14 "47R 0201" R0201 73.727,92.051 r90 top
R14_1 "47R 0201" R0201 121.727,92.051 r90 top (schematic designator R14)
R14_2 "47R 0201" R0201 73.727,56.051 r90 top (schematic designator R14)
R14_3 "47R 0201" R0201 121.727,56.051 r90 top (schematic designator R14)
R15 "47K_0402" R0402 78.612,80.963 r90 top
R15_1 "47K_0402" R0402 126.612,80.963 r90 top (schematic designator R15)
R15_2 "47K_0402" R0402 78.612,44.963 r90 top (schematic designator R15)
R15_3 "47K_0402" R0402 126.612,44.963 r90 top (schematic designator R15)
R16 "100K 0201" R0201 75.062,89.375 r270 top
R16_1 "100K 0201" R0201 123.062,89.375 r270 top (schematic designator R16)
R16_2 "100K 0201" R0201 75.062,53.375 r270 top (schematic designator R16)
R16_3 "100K 0201" R0201 123.062,53.375 r270 top (schematic designator R16)
R17 "4.7K 0201" R0201 85.188,80.654 r270 top
R17_1 "4.7K 0201" R0201 133.188,80.654 r270 top (schematic designator R17)
R17_2 "4.7K 0201" R0201 85.188,44.654 r270 top (schematic designator R17)
R17_3 "4.7K 0201" R0201 133.188,44.654 r270 top (schematic designator R17)
R18 "100K 0201" R0201 74.392,89.375 r270 top
R18_1 "100K 0201" R0201 122.392,89.375 r270 top (schematic designator R18)
R18_2 "100K 0201" R0201 74.392,53.375 r270 top (schematic designator R18)
R18_3 "100K 0201" R0201 122.392,53.375 r270 top (schematic designator R18)
R19 "100K 0201" R0201 73.727,89.375 r270 top
R19_1 "100K 0201" R0201 121.727,89.375 r270 top (schematic designator R19)
R19_2 "100K 0201" R0201 73.727,53.375 r270 top (schematic designator R19)
R19_3 "100K 0201" R0201 121.727,53.375 r270 top (schematic designator R19)
R20 "15K_0402" R0402 78.172,82.385 r180 top
R20_1 "15K_0402" R0402 126.172,82.385 r180 top (schematic designator R20)
R20_2 "15K_0402" R0402 78.172,46.385 r180 top (schematic designator R20)
R20_3 "15K_0402" R0402 126.172,46.385 r180 top (schematic designator R20)
R21 "100K 0201" R0201 75.717,91.418 r90 top
R21_1 "100K 0201" R0201 123.717,91.418 r90 top (schematic designator R21)
R21_2 "100K 0201" R0201 75.717,55.418 r90 top (schematic designator R21)
R21_3 "100K 0201" R0201 123.717,55.418 r90 top (schematic designator R21)
R22 "31.6K_0402" R0402 73.029,85.877 r90 top
R22_1 "31.6K_0402" R0402 121.029,85.877 r90 top (schematic designator R22)
R22_2 "31.6K_0402" R0402 73.029,49.877 r90 top (schematic designator R22)
R22_3 "31.6K_0402" R0402 121.029,49.877 r90 top (schematic designator R22)
R23 "10K_0402" R0402 79.616,86.027 r270 top
R23_1 "10K_0402" R0402 127.616,86.027 r270 top (schematic designator R23)
R23_2 "10K_0402" R0402 79.616,50.027 r270 top (schematic designator R23)
R23_3 "10K_0402" R0402 127.616,50.027 r270 top (schematic designator R23)
R24 "10K_0402" R0402 72.095,85.877 r270 top
R24_1 "10K_0402" R0402 120.095,85.877 r270 top (schematic designator R24)
R24_2 "10K_0402" R0402 72.095,49.877 r270 top (schematic designator R24)
R24_3 "10K_0402" R0402 120.095,49.877 r270 top (schematic designator R24)
R25 "100K 0201" R0201 69.858,89.35 r180 top
R25_1 "100K 0201" R0201 117.858,89.35 r180 top (schematic designator R25)
R25_2 "100K 0201" R0201 69.858,53.35 r180 top (schematic designator R25)
R25_3 "100K 0201" R0201 117.858,53.35 r180 top (schematic designator R25)
R26 "0R 0201" R0201 67.608,89.35 r180 top
R26_1 "0R 0201" R0201 115.608,89.35 r180 top (schematic designator R26)
R26_2 "0R 0201" R0201 67.608,53.35 r180 top (schematic designator R26)
R26_3 "0R 0201" R0201 115.608,53.35 r180 top (schematic designator R26)
R27 "100K 0201" R0201 72.591,78.511 r180 top
R27_1 "100K 0201" R0201 120.591,78.511 r180 top (schematic designator R27)
R27_2 "100K 0201" R0201 72.591,42.511 r180 top (schematic designator R27)
R27_3 "100K 0201" R0201 120.591,42.511 r180 top (schematic designator R27)
R28 "20K_0402" R0402 69.177,82.665 r270 top
R28_1 "20K_0402" R0402 117.177,82.665 r270 top (schematic designator R28)
R28_2 "20K_0402" R0402 69.177,46.665 r270 top (schematic designator R28)
R28_3 "20K_0402" R0402 117.177,46.665 r270 top (schematic designator R28)
R29 "30K_0402" R0402 70.193,82.665 r90 top
R29_1 "30K_0402" R0402 118.193,82.665 r90 top (schematic designator R29)
R29_2 "30K_0402" R0402 70.193,46.665 r90 top (schematic designator R29)
R29_3 "30K_0402" R0402 118.193,46.665 r90 top (schematic designator R29)
RF0_CTRL "测试点" 测试点_2#2 81.49,103.766 r90 top
RF0_CTRL_1 "测试点" 测试点_2#2 129.49,103.809 r90 top (schematic designator RF0_CTRL)
RF0_CTRL_2 "测试点" 测试点_2#2 81.49,67.809 r90 top (schematic designator RF0_CTRL)
RF0_CTRL_3 "测试点" 测试点_2#2 129.49,67.809 r90 top (schematic designator RF0_CTRL)
RF2_CTRL "测试点" 测试点_2#2 65.062,97.033 r90 top
RF2_CTRL_1 "测试点" 测试点_2#2 112.935,97.137 r90 top (schematic designator RF2_CTRL)
RXD "测试点" 测试点_2#1 90.127,91.712 r90 top (schematic designator RXD1)
RXD_1 "测试点" 测试点_2#1 138.127,91.712 r90 top (schematic designator RXD1)
RXD_2 "测试点" 测试点_2#1 90.127,55.712 r90 top (schematic designator RXD1)
RXD_3 "测试点" 测试点_2#1 138.127,55.712 r90 top (schematic designator RXD1)
TXD "测试点" 测试点_2#1 88.127,91.712 r90 top (schematic designator TXD1)
TXD_1 "测试点" 测试点_2#1 136.127,91.712 r90 top (schematic designator TXD1)
TXD_2 "测试点" 测试点_2#1 88.127,55.712 r90 top (schematic designator TXD1)
TXD_3 "测试点" 测试点_2#1 136.127,55.712 r90 top (schematic designator TXD1)
U1 "CBU5000V210" BGA_CBU5000V210 72.792,93.633 r90 top
U1_1 "CBU5000V210" BGA_CBU5000V210 120.792,93.633 r90 top (schematic designator U1)
U1_2 "CBU5000V210" BGA_CBU5000V210 72.792,57.633 r90 top (schematic designator U1)
U1_3 "CBU5000V210" BGA_CBU5000V210 120.792,57.633 r90 top (schematic designator U1)
U3 "gd32e230k8u6" QFN-32_L5.0-W5.0-P0.50-BL-EP3.4 88.396,95.484 r270 top
U3_1 "gd32e230k8u6" QFN-32_L5.0-W5.0-P0.50-BL-EP3.4 136.396,95.484 r270 top (schematic designator U3)
U3_2 "gd32e230k8u6" QFN-32_L5.0-W5.0-P0.50-BL-EP3.4 88.396,59.484 r270 top (schematic designator U3)
U3_3 "gd32e230k8u6" QFN-32_L5.0-W5.0-P0.50-BL-EP3.4 136.396,59.484 r270 top (schematic designator U3)
U4 "sgm2210" SOT-23-5_L2.9-W1.6-P0.95-LS2.8-BL 81.877,81.32 r90 top
U4_1 "sgm2210" SOT-23-5_L2.9-W1.6-P0.95-LS2.8-BL 129.877,81.32 r90 top (schematic designator U4)
U4_2 "sgm2210" SOT-23-5_L2.9-W1.6-P0.95-LS2.8-BL 81.877,45.32 r90 top (schematic designator U4)
U4_3 "sgm2210" SOT-23-5_L2.9-W1.6-P0.95-LS2.8-BL 129.877,45.32 r90 top (schematic designator U4)
U5 "eta5050v0s2f" SOT-23-5_L3.0-W1.5-P0.95-LS2.8-BL 76.326,85.877 r90 top
U5_1 "eta5050v0s2f" SOT-23-5_L3.0-W1.5-P0.95-LS2.8-BL 124.326,85.877 r90 top (schematic designator U5)
U5_2 "eta5050v0s2f" SOT-23-5_L3.0-W1.5-P0.95-LS2.8-BL 76.326,49.877 r90 top (schematic designator U5)
U5_3 "eta5050v0s2f" SOT-23-5_L3.0-W1.5-P0.95-LS2.8-BL 124.326,49.877 r90 top (schematic designator U5)
U6 "FLASHMEM2X3" USON8L 71.133,91.029 r180 top
U6_1 "FLASHMEM2X3" USON8L 119.133,91.029 r180 top (schematic designator U6)
U6_2 "FLASHMEM2X3" USON8L 71.133,55.029 r180 top (schematic designator U6)
U6_3 "FLASHMEM2X3" USON8L 119.133,55.029 r180 top (schematic designator U6)
U7 "eta3485s2f" SOT-23-5_L2.9-W1.6-P0.95-LS2.8-BL 73.241,81.051 r0 top
U7_1 "eta3485s2f" SOT-23-5_L2.9-W1.6-P0.95-LS2.8-BL 121.241,81.051 r0 top (schematic designator U7)
U7_2 "eta3485s2f" SOT-23-5_L2.9-W1.6-P0.95-LS2.8-BL 73.241,45.051 r0 top (schematic designator U7)
U7_3 "eta3485s2f" SOT-23-5_L2.9-W1.6-P0.95-LS2.8-BL 121.241,45.051 r0 top (schematic designator U7)
U8 "smf18a_c19077512" SOD-123FL_L2.8-W1.8-LS3.8-R-RD 90.64,85.496 r0 top
U8_1 "smf18a_c19077512" SOD-123FL_L2.8-W1.8-LS3.8-R-RD 138.64,85.496 r0 top (schematic designator U8)
U8_2 "smf18a_c19077512" SOD-123FL_L2.8-W1.8-LS3.8-R-RD 90.64,49.496 r0 top (schematic designator U8)
U8_3 "smf18a_c19077512" SOD-123FL_L2.8-W1.8-LS3.8-R-RD 138.64,49.496 r0 top (schematic designator U8)
VCC "测试点" 测试点_2#1 94.127,91.712 r90 top
VCC_1 "测试点" 测试点_2#1 142.127,91.712 r90 top (schematic designator VCC)
VCC_2 "测试点" 测试点_2#1 94.127,55.712 r90 top (schematic designator VCC)
VCC_3 "测试点" 测试点_2#1 142.127,55.712 r90 top (schematic designator VCC)
Y1 "XTAL2016" SMD2016 78.784,92.173 r180 top
Y1_1 "XTAL2016" SMD2016 126.784,92.173 r180 top (schematic designator Y1)
Y1_2 "XTAL2016" SMD2016 78.784,56.173 r180 top (schematic designator Y1)
Y1_3 "XTAL2016" SMD2016 126.784,56.173 r180 top (schematic designator Y1)
? "M_SWCLK" 测试点_2#1 90.127,53.712 r90 top

## Footprints (in the part's own frame and the unit in brackets; to place one, negate y for a bottom-side part, rotate by r counter-clockwise, add the part's x,y. Pads: shape width x height; smd on the part's side, far side on the other; paste and mask are expansions set on the pad)
BGA_CBU5000V210 [mm]
  round 0.27 smd paste-2539.97 mask-2539.97: A1(0,0) A2(0.4,0) A3(0.8,0) A4(1.2,0) A5(1.6,0) A6(2,0) A7(2.4,0) A8(2.8,0) A9(3.2,0) B1(0,-0.4) B2(0.4,-0.4) B3(0.8,-0.4) B4(1.2,-0.4) B5(1.6,-0.4) B6(2,-0.4) B7(2.4,-0.4) B8(2.8,-0.4) B9(3.2,-0.4) C1(0,-0.8) C2(0.4,-0.8) C3(0.8,-0.8) C4(1.2,-0.8) C5(1.6,-0.8) C6(2,-0.8) C7(2.4,-0.8) C9(3.2,-0.8) D1(0,-1.2) D2(0.4,-1.2) D3(0.8,-1.2) D4(1.2,-1.2) D5(1.6,-1.2) D6(2,-1.2) D7(2.4,-1.2) D9(3.2,-1.2) E1(0,-1.6) E2(0.4,-1.6) E3(0.8,-1.6) E4(1.2,-1.6) E5(1.6,-1.6) E6(2,-1.6) E9(3.2,-1.6) F1(0,-2) F2(0.4,-2) F3(0.8,-2) F4(1.2,-2) F5(1.6,-2) F7(2.4,-2) F8(2.8,-2) F9(3.2,-2) G1(0,-2.4) G2(0.4,-2.4) G3(0.8,-2.4) G4(1.2,-2.4) G5(1.6,-2.4) G6(2,-2.4) G7(2.4,-2.4) G8(2.8,-2.4) G9(3.2,-2.4) H1(0,-2.8) H2(0.4,-2.8) H3(0.8,-2.8) H4(1.2,-2.8) H5(1.6,-2.8) H6(2,-2.8) H7(2.4,-2.8) H8(2.8,-2.8) H9(3.2,-2.8)
  silkscreen extent -0.5,-3 3.4,0.5
C0201_2 [mm]
  rect 0.3x0.35 smd mask+0.05: 1(-0.3,0) 2(0.3,0)
  silkscreen extent -0.64,-0.33 0.63,0.34, body extent -0.3,-0.16 0.3,0.16, height 0.31
C0402 [mil]
  rect 20x20 smd mask+2: 1(-16,0) 2(16,0)
  silkscreen extent -35,-20 36,20, body extent -20,-10 20,10, height 20
DFN-6_L1.1-W0.7-P0.40-BL [mm]
  rect 0.22x0.42 smd: 1(-0.4,-0.325) 2(0,-0.325) 3(0.4,-0.325) 4(0.4,0.325) 5(0,0.325) 6(-0.4,0.325)
  silkscreen extent -0.7,-0.83 0.7,0.35
HDR-TH_4P-P2.00-V-M [mm]
  rect 1.524x1.4 hole 0.9: 1(-3,0)
  round 1.4 hole 0.9: 2(-1,0) 3(1,0) 4(3,0)
  silkscreen extent -4,-1 4,1.02
QFN-32_L5.0-W5.0-P0.50-BL-EP3.4 [mm]
  oval 0.28x0.8 smd paste+0 mask+0.05: 1(-1.75,-2.4) 2(-1.25,-2.4) 3(-0.75,-2.4) 4(-0.25,-2.4) 5(0.25,-2.4) 6(0.75,-2.4) 7(1.25,-2.4) 8(1.75,-2.4) 17(1.75,2.4) 18(1.25,2.4) 19(0.75,2.4) 20(0.25,2.4) 21(-0.25,2.4) 22(-0.75,2.4) 23(-1.25,2.4) 24(-1.75,2.4)
  oval 0.8x0.28 smd paste+0 mask+0.05: 9(2.4,-1.75) 10(2.4,-1.25) 11(2.4,-0.75) 12(2.4,-0.25) 13(2.4,0.25) 14(2.4,0.75) 15(2.4,1.25) 16(2.4,1.75) 25(-2.4,1.75) 26(-2.4,1.25) 27(-2.4,0.75) 28(-2.4,0.25) 29(-2.4,-0.25) 30(-2.4,-0.75) 31(-2.4,-1.25) 32(-2.4,-1.75)
  rect 3.4x3.4 smd paste+0 mask+0.05: 33(0,0)
  silkscreen extent -2.5,-3.43 2.5,2.5
R0201 [mm]
  rect 0.3x0.35 smd mask+0.05: 1(-0.3,0) 2(0.3,0)
  silkscreen extent -0.64,-0.33 0.63,0.34, body extent -0.3,-0.15 0.3,0.15, height 0.23
R0402 [mil]
  rect 20x20 smd mask+2: 1(16,0) 2(-16,0)
  silkscreen extent -35,-20 36,20, body extent -20,-10 20,10, height 12
SMD2016 [mm] "不常用，单价高，"
  rrect50% 0.9x0.8 smd mask+0.05: 1(0.7,0.55) 2(-0.7,0.55) 3(-0.7,-0.55) 4(0.7,-0.55)
  silkscreen extent -1.25,-1.06 1.28,1.09, body extent -1.01,-0.8 1,0.81, height 0.66
SOD-123FL_L2.8-W1.8-LS3.8-R-RD [mm]
  rect 1.3x1.2 smd: 1(1.65,0) 2(-1.65,0)
  silkscreen extent -1.6,-0.95 1.38,0.95
SOD-882_L1.0-W0.6-BI [mm]
  rect 0.3x0.6 smd paste+0 mask+0.05: 1(-0.325,0) 2(0.325,0)
  silkscreen extent -0.75,-0.4 0.75,0.4
SOT-23-5_L2.9-W1.6-P0.95-LS2.8-BL [mm]
  rect 0.599x1.001 smd paste+0 mask+0.051: 1(-0.95,-1.1) 2(0,-1.1) 3(0.95,-1.1) 4(0.95,1.1) 5(-0.95,1.1)
  silkscreen extent -1.52,-0.7 1.4,0.89
SOT-23-5_L3.0-W1.5-P0.95-LS2.8-BL [mm]
  rect 0.531x1.044 smd: 1(-0.95,-1.25) 2(0,-1.25) 3(0.95,-1.25) 4(0.95,1.25) 5(-0.95,1.25)
  silkscreen extent -1.82,-1.45 1.55,0.9
USON8L [mm]
  oval 0.7x0.3 smd paste-2539.97 mask-2539.97: 1(0,0)
  rect 0.7x0.3 smd paste-2539.97 mask-2539.97: 2(0,-0.5) 3(0,-1) 4(0,-1.5) 5(2.55,-1.5) 6(2.55,-1) 7(2.55,-0.5) 8(2.55,0)
  rect 0.4x1.8 smd paste-2539.97 mask-2539.97: 9(1.275,-0.75)
  silkscreen extent -0.8,-1.8 2.83,0.8
测试点_2#1 [mil]
  round 50 smd: 1(-81,-2)
测试点_2#2 [mil]
  round 50 smd far side: 1(-81,-2)
贴片电感(3*3MM)(3010) [mm]
  rect 1x2.8 smd: 1(1.247,0) 2(-1.247,0)
  Top Layer pour cut-out: -0.746,1.405 0.747,1.405 0.747,-1.4 -0.75,-1.4
  silkscreen extent -1.64,-1.64 1.66,1.61, body extent -1.55,-1.4 1.57,1.4, height 1.5